# Altium PCB Board3ph.PcbDoc (part 3 of 4)
Units mil, origin at the board's own origin, x right, y up, seen from the top; angles counter-clockwise.
Board outline 2522.05 x 3126.78 mil, 4 copper layers (Top Layer, Mid Layer, Mid Layer 2, Bottom Layer), stack 61.653 mil thick; 132 components, 105 nets, 468 pads, 161 vias.
Unrouted connection lines stored in the file: 3.
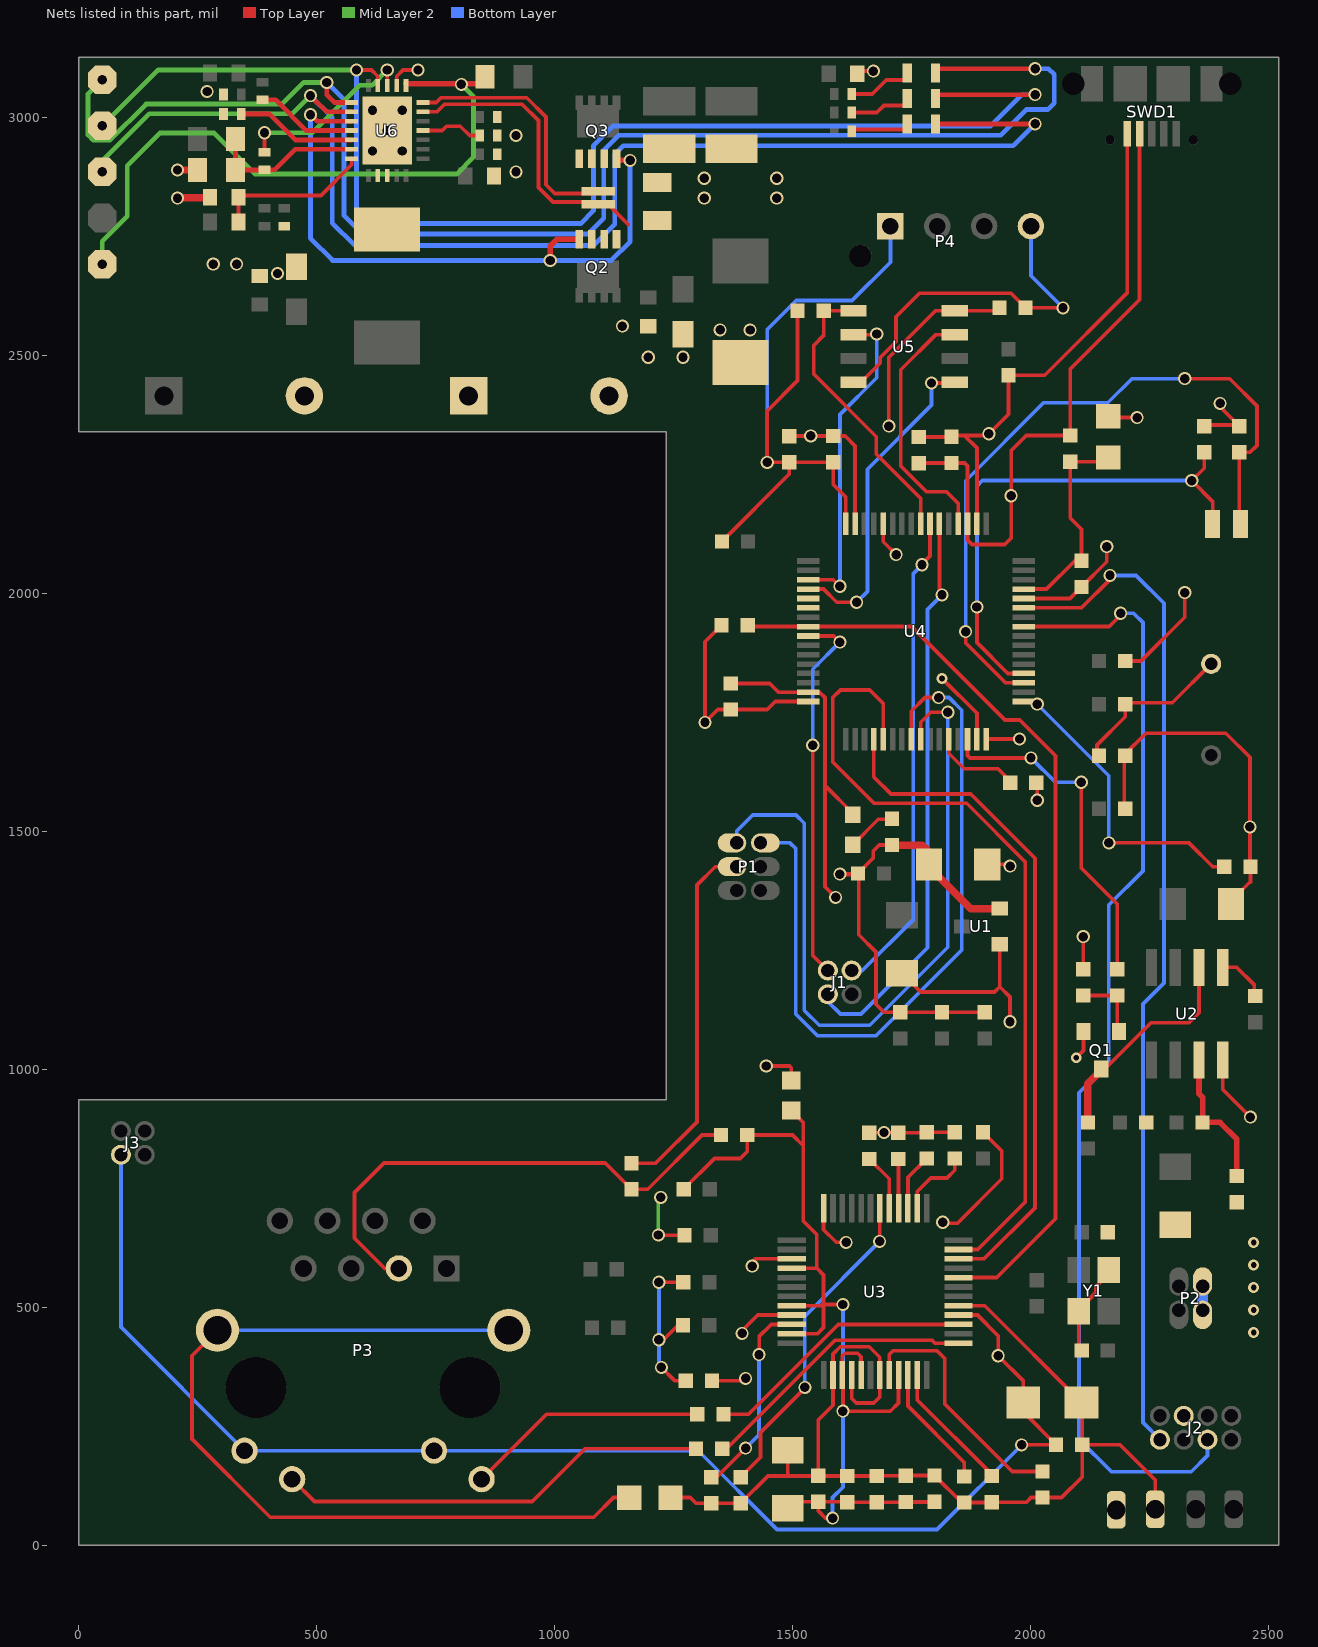
[diagram p4: the nets of this part, all layers, seen from the top]

## Via types
v1: diameter 27.56, hole 19.68, Top Layer to Bottom Layer, 151 vias
v2: diameter 23.62, hole 11.81, Top Layer to Bottom Layer, 6 vias
v3: diameter 27.56, hole 19.68, Top Layer to Bottom Layer, tented both sides, 2 vias
v4: diameter 21.65, hole 11.81, Top Layer to Bottom Layer, 1 vias
v5: diameter 31.5, hole 15.75, Top Layer to Bottom Layer, 1 vias

## Nets (pads, with @x,y where several pads share a name; then routed paths per layer and width w, separated by ;. In a path a pad name is that pad's centre, name@x,y a point inside that pad or via, vN(x,y) a via of type N, cw(c..) or ccw(c..) an arc to the next point about the centre after c; other vN are vias at no path point) (continued)
NetR23_2: (continued)
  Bottom Layer w7.87: v1(1401.57,204.33) 1429.53,232.28 v1(1429.53,400.79)
NetR27_2: R27.2 U3.23 | length 277.1
  Top Layer w7.87: U3.23@1762.2,357.87 1762.2,305.51 1918.9,148.82 R27.2@1918.9,145.67
NetR31_1: R31.1 R37.2 U6.19 | length 330.8
  Top Layer w8: R31.1@336,2780.29 R37.2@336,2832 339.94,2835.94 509.22,2835.94 573.82,2900.54 U6.19@573.82,2913.46
NetR34_1: R34.1 U4.62 | length 721.1
  Top Layer w7.87: U4.62@1867.71,1694.09 1867.71,1659.61 1872.94,1654.39 v1(2001.18,1654.39) ; v1(2106.69,1603.15) 2106.69,1422.93 2182.23,1347.39 R34.1@2182.23,1210.23
  Bottom Layer w7.87: v1(2001.18,1654.39) 2052.42,1603.15 v1(2106.69,1603.15)
NetR36_1: R36.1 U6.16 | length 213.8
  Top Layer w10: R36.1@386.71,3037 413.87,3037 478.36,2972.51 U6.16@573.82,2972.51
NetR38_1: R38.1 R39.1 R43.2 U6.18 | length 345.2
  Top Layer w10: R38.1@330,2954.67 R38.1@330,2949.67 ; R38.1@343.05,2936.62 R38.1@330,2949.67 ; U6.18@573.82,2933.14 455.48,2933.14 412.35,2890.01 391.03,2890.01 R39.1@390.71,2889.69 R43.2@330,2889.69 R38.1@330,2949.67
NetR39_2: R39.2 U6.10 | length 386.5
  Top Layer w7.87: R39.2@390.71,2926.69 v1(390.71,2967.9) ; U6.10@648.62,3067 v1(648.62,3099.75)
  Mid Layer 2 w10: v1(390.71,2967.9) 490.74,2967.9 590.66,3067.82 616.68,3067.82 v1(648.62,3099.75)
NetR44_1: R44.1 TP4.1 U6.8 | length 1370.8
  Top Layer w12: U6.8@687.99,3070.67 839.33,3070.67 R44.1@854.16,3085.5
  Mid Layer 2 w10: v1(50,2691.79) 50,2740.03 102.42,2792.45 102.42,2898.61 171.36,2967.54 284.46,2967.54 370.87,2881.13 794.2,2881.13 830,2916.93 830,3043.62 v1(804.19,3069.44)
NetR45_2: R45.2 U6.4 | length 131.2
  Top Layer w7.87: U6.4@723.42,2972.51 764.15,2972.51 773.34,2981.7 802.06,2981.7 821.81,2961.95 R45.2@842.66,2961.95